# Altium PCB Single_ETU_b_rev1.PcbDoc (part 5 of 6)
Units mil, origin at the board's own origin, x right, y up, seen from the top; angles counter-clockwise.
Board outline 5341 x 2710 mil, 10 copper layers (Top Layer, GND1, Signal 1, GND2, VDDA, VDD, GND3, Signal 2, GND4, Bottom Layer), stack 59.76 mil thick; 283 components, 478 nets, 1863 pads, 875 vias.
Unrouted connection lines stored in the file: 3.
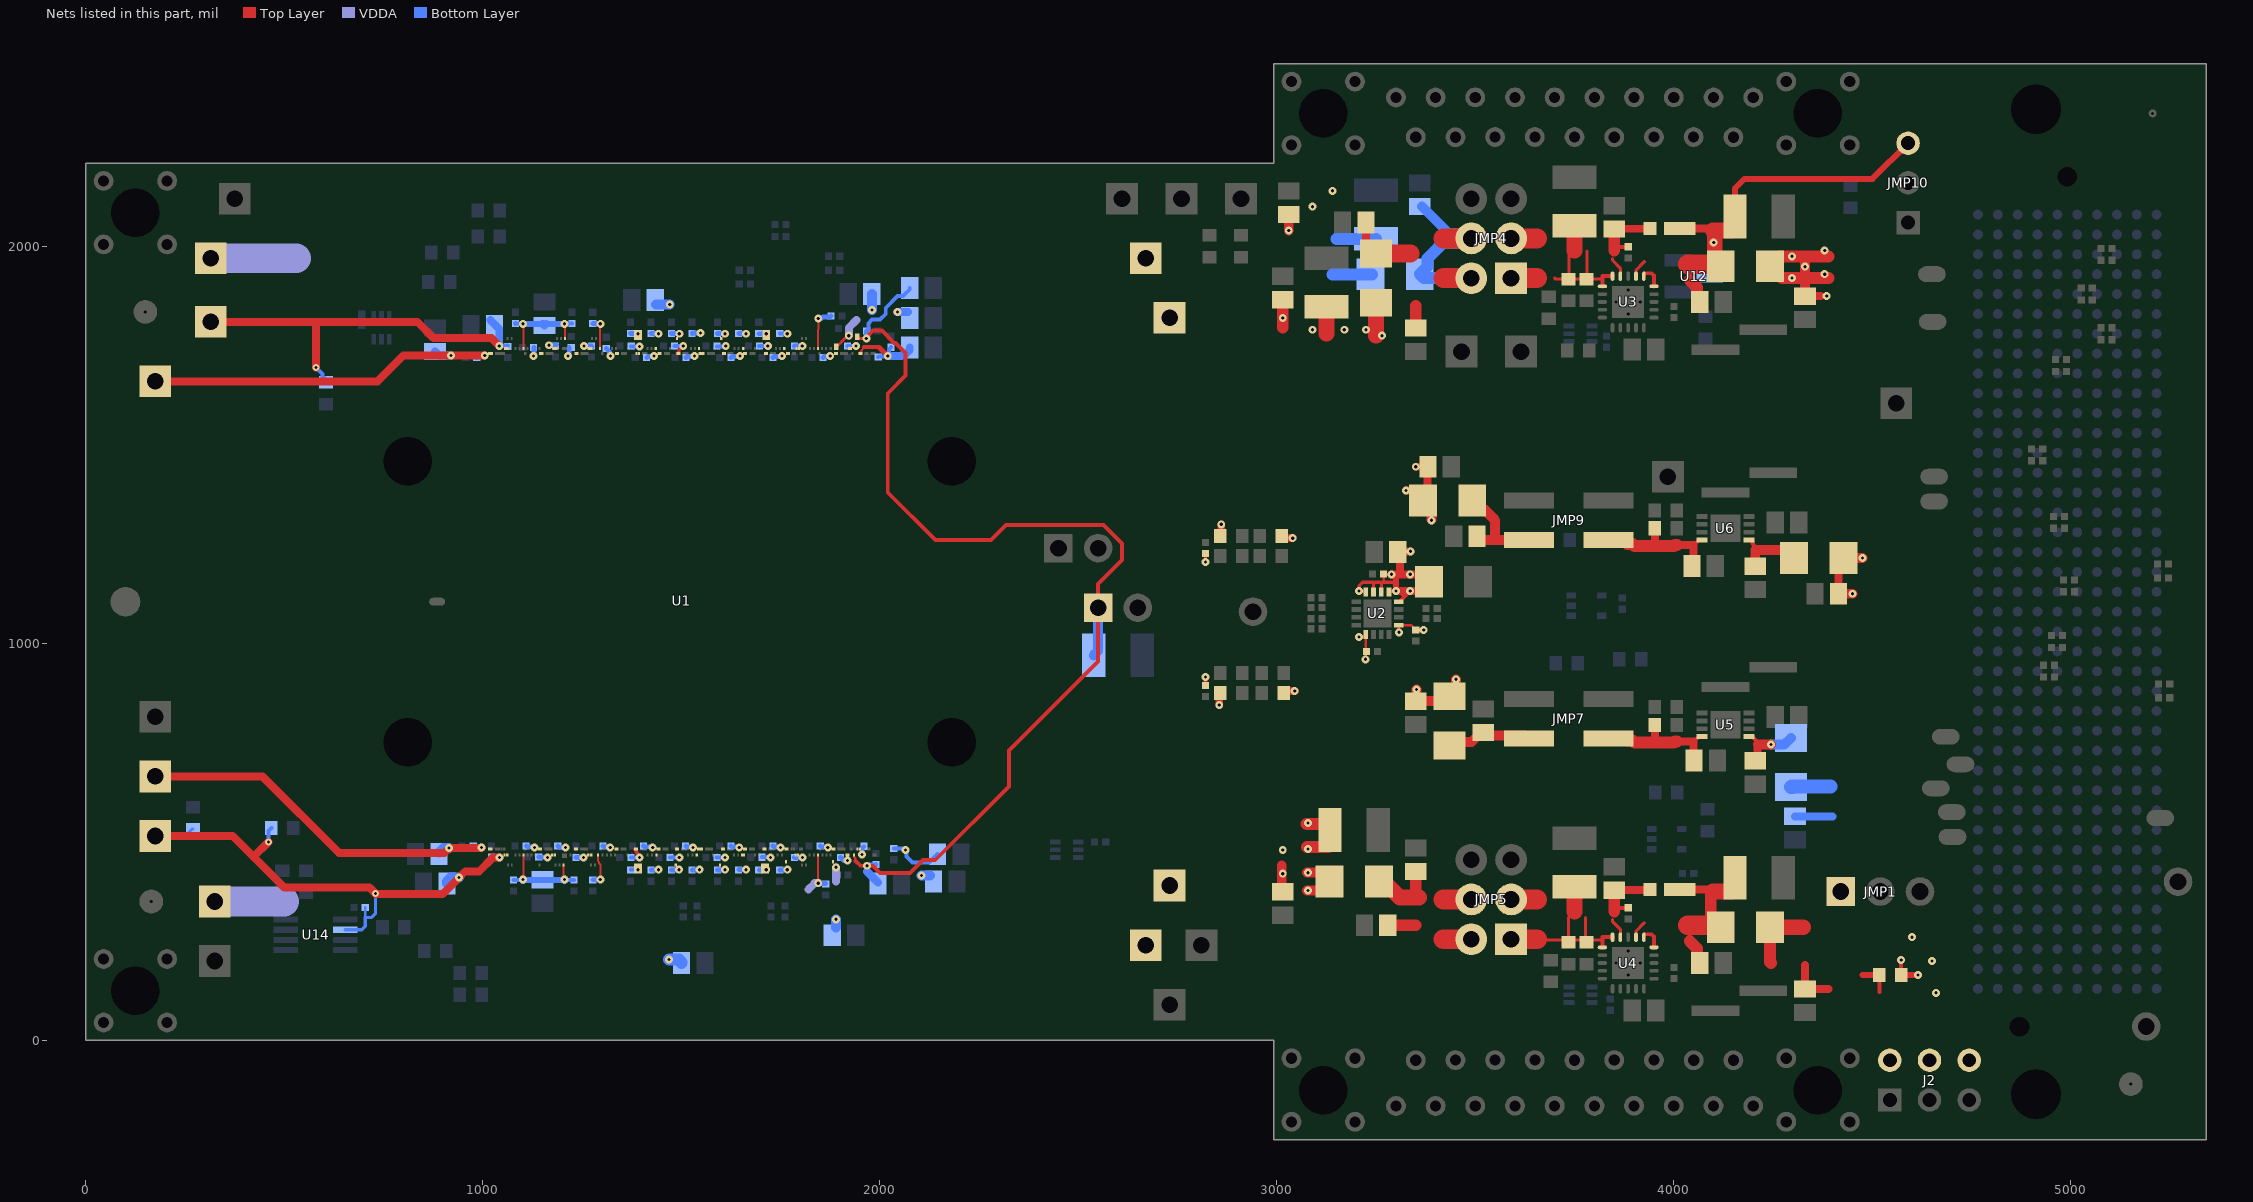
[diagram p13: the nets of this part, all layers, seen from the top]

## Via types
v1: diameter 20, hole 8, Top Layer to Bottom Layer, tented bottom, 402 vias
v2: diameter 20, hole 8, Top Layer to Bottom Layer, 199 vias
v3: diameter 30, hole 16, Top Layer to Bottom Layer, 160 vias
v4: diameter 20, hole 8, Top Layer to Bottom Layer, tented top, 89 vias
v5: diameter 18, hole 8, Top Layer to Bottom Layer, 6 vias
v6: diameter 18/25/25/25/25/18 (per signal layer), hole 8, Top Layer to Bottom Layer, tented bottom, 4 vias
v7: diameter 18/20/20/20/20/18 (per signal layer), hole 8, Top Layer to Bottom Layer, tented bottom, 4 vias
v8: diameter 80, hole 42, Top Layer to Bottom Layer, 2 vias
v9: diameter 18/25/25/25/25/18 (per signal layer), hole 8, Top Layer to Bottom Layer, 2 vias
v10: diameter 20/20/20/20/20/18 (per signal layer), hole 8, Top Layer to Bottom Layer, tented bottom, 2 vias
v11: diameter 40/20/20/20/20/40 (per signal layer), hole 8, Top Layer to Bottom Layer, 2 vias
v12: diameter 20/20/20/20/20/18 (per signal layer), hole 8, Top Layer to Bottom Layer, 1 vias
v13: diameter 40/20/20/20/20/40 (per signal layer), hole 8, Top Layer to Bottom Layer, tented top, 1 vias
v14: diameter 20, hole 8, Top Layer to Bottom Layer, tented both sides, 1 vias

## Nets (pads, with @x,y where several pads share a name; then routed paths per layer and width w, separated by ;. In a path a pad name is that pad's centre, name@x,y a point inside that pad or via, vN(x,y) a via of type N, cw(c..) or ccw(c..) an arc to the next point about the centre after c; other vN are vias at no path point) (continued)
VCC_33_U2: C67.1 C68.1 C69.1 C76.1 C163.1 C164.1 L1.2 R4.2 R5.2 R6.2 R7.2 U2.5 U2.9 U2.12 U2.13 U2.14 U2.15 U2.16 | length 887.8
  Top Layer w6: v4@3224,961 C69.1@3224,979 ; C69.1@3224.02,978.02 3224.02,1018.82 U2.5@3224.02,1021.93 ; C68.1@3265.68,1174 v4(3289,1174) ; 3269,1153.68 C68.1@3269,1177 ; U2.9@3307.09,1045.95 3338.05,1045.95 C76.1@3350,1034 v4(3370,1034) ; v4@3307.54,1028.46 U2.9@3307.54,1045.49
  Top Layer w7: v4@3208.49,1130.51 U2.16@3223.11,1130.51 ; v4@3208.91,1017.91 U2.5@3223.11,1017.91 ; U2.13@3283.58,1130.51 v4@3298.51,1130.51 ; U2.9@3307.09,1045.95 U2.9@3307.54,1045.49 ; v4@3307.54,1028.46 v4(3308,1028)
  Top Layer w8: v4(2820,1205) C163.1@2820,1226 ; v4@3207.75,1131.25 3207.75,1145.75 3216,1154 3248.5,1154 ; U2.15@3243.31,1129.02 3243.31,1148.81 3248.5,1154 ; U2.14@3263.39,1129.02 3263.39,1152.64 3264.75,1154 ; v4@3286.7,1171.7 v4(3289,1174) ; v4@3298.51,1130.35 v4@3298.51,1130.51 ; v4(3300,1132) 3305,1132 3320.22,1116.78 ; 3300,1146 3292,1154 3264.75,1154 ; U2.12@3307.09,1105 U2.12@3309,1105 ; 3248.5,1154 3264.75,1154
  Top Layer w9: U2.12@3309,1105 v4(3336,1132)
  Top Layer w10: C164.1@2820,894 v4(2820,915) ; R7.2@3017.56,875 R7.2@3022.56,880 ; v4(3207,1016) v4@3208.91,1017.91 ; v4(3207,1132) v4@3208.49,1130.51 ; U2.5@3223.11,1017.91 3224.02,1018.82 U2.5@3224.02,1021.93 ; U2.16@3223.11,1130.51 3224.02,1129.6 U2.16@3224.02,1129.02 ; U2.13@3282.68,1129.02 3282.68,1129.6 U2.13@3283.58,1130.51 ; v4@3298.51,1130.51 v4(3300,1132) ; v4@3299,1135 v4@3300,1134 ; v4(3370,1034) v4@3370,1036
  Top Layer w15: v4(3300,1132) 3300,1134 3300,1146 3300,1174 3300,1175
  Top Layer w20: v4(2855,845) R6.2@2855,868.32 ; R5.2@2860,1276.68 v4(2860,1300) ; R4.2@3016.68,1265 v4(3040,1265) ; R7.2@3022.56,880 v4(3045,880) ; v4(3289,1174) 3300,1174 v4(3336,1174) L1.2@3359.32,1174 ; v4(3300,1132) L1.2@3359.32,1132 ; C67.1@3304.53,1230 3304.53,1224.09 3310,1218.62 3310,1175 ; C67.1@3313.68,1232 v4(3337,1232)
  other v4: 3223,960
VDD: C2.1 C5.1 C8.1 C12.1 C16.1 C20.1 C24.1 C27.1 C31.1 C35.1 C38.1 C41.1 C45.1 C49.1 C53.1 C57.1 C60.1 C64.1 C84.1 C85.1 C86.1 C87.1 C121.1 C122.1 C178.1 L3.2 R36.1 R37.1 R39.1 TP8.1 TP13.1 U1.7 U1.8 U1.25 U1.26 U1.39 U1.40 U1.57 U1.58 U1.73 U1.74 U1.91 U1.92 U1.107 U1.108 U1.119 U1.120 U1.139 U1.140 U1.154 U1.155 U1.172 U1.173 U1.186 U1.187 U1.204 U1.205 U1.220 U1.221 U1.238 U1.239 U1.254 U1.255 U1.266 U1.267 U1.286 U1.287 U14.2 | length 3110.5
  Top Layer w8: U1.220@1490,1730 1490,1731.34 1493.95,1735.29 1493.95,1737.68 1505,1748.73 v1(1505,1749)
  Top Layer w9: U1.57@1383,482 1387.05,477.95 1387.05,474.09 1391.9,469.24 v1@1391.9,463.1 ; v1@1392.9,463.1 v1(1395,461)
  Top Layer w20: TP13.1@175,515 370,515 422.5,462.5 ; TP8.1@315,1810 575,1810 ; v5(460,500) 422.5,462.5 ; v5(580,1695) 580,1805 575,1810 ; v5@730,369 899,369 v1(940,410) 956,426 991,426 1026,461 v1(1042,461) ; v5(730,370) 715,385 500,385 422.5,462.5 ; v1(1041.53,1749) 1021.53,1769 876,1769 835,1810 575,1810
  Top Layer w30: 3015,1795 C85.1@3015,1865.47
  Top Layer w40: 3125,1780 C84.1@3125,1847.95 C84.1@3130.02,1852.98 ; L3.2@3244.98,1852.98 L3.2@3250,1858 3250,1775
  Bottom Layer w7: 704,311.24 C178.1@704,335
  Bottom Layer w8: TP13.1@175,515 180,510 245.59,510 268.03,532.44 R39.1@270,532.44 ; U14.2@653.8,278.8 695.31,278.8 704,287.49 704,311.24 705.24,310 720,310 730,320 v5(730,370)
  Bottom Layer w10: v5(460,500) 460,527.56 R37.1@467.44,535 ; v5(580,1695) 595.93,1679.06 595.93,1668.31 601.69,1668.31 610,1660 607.56,1657.56 R36.1@605,1657.56 ; C12.1@1373,461 v1(1395,461) ; C45.1@1373.43,1748 v1@1396,1748 ; C16.1@1472,461 v1(1495,461) ; C49.1@1483,1749 v1(1505,1749) ; C20.1@1589,461 v1@1613,461 ; C53.1@1589.84,1748 v1@1612.35,1748 ; C57.1@1696,1749 v1(1718,1749) ; C24.1@1703,461.46 v1@1724.54,461.46 ; C64.1@1919,1749 v1(1940,1749)
  Bottom Layer w12: C2.1@1023,460 1023.5,460.5 1041.5,460.5 v1(1042,461) ; v1@1041,1749.5 C35.1@1063,1749.5 ; v1@1041.03,1749.5 v1(1041.53,1749) ; C5.1@1141,462 1141.5,461.5 1162.5,461.5 v1(1163,461) ; v1@1165.53,1752 C38.1@1185.53,1752 ; C8.1@1235,461 v1(1253.57,461) ; v1@1253,1749 C41.1@1274,1749 C41.1@1276,1747 ; v1@1724.54,461.46 v1(1725,461) ; C27.1@1785,461 v1(1805.36,461) ; C60.1@1785,1749 v1(1804.89,1749) ; C31.1@1901,461 1909.03,453 v1(1919,453) v1@1917.03,453
  Bottom Layer w20: C86.1@1019.53,1814.09 1041.53,1792.09 v1(1041.53,1749) ; v1(2045,1835) C87.1@2071.47,1835
  Bottom Layer w25: C121.1@909.53,395 909.53,400.85 918.68,410 v1(940,410) ; v1(2105,415) C122.1@2126.32,415
  other v1: 1610,461 1395,1748 1255,1749 1612,1749 1167,1751
  other v2: 3265,1775 3090,1790 3170,1790 3225,1790 3015,1820
VDD2V5: C32.1 C65.1 C77.1 C106.1 C140.1 J3.1 U1.142 U1.289 | length 2832.5
  Top Layer w6: U1.142@1935,467 1935,462.46 1938,459.46 1938,453 1939,452
  Top Layer w8: U1.289@1943,1772 1947,1768 v1(1966,1768)
  Top Layer w10: 1939,452 1951,440 v1(1968,440) 1968.18,439.82 1983.18,439.82 2001,422 2076.14,422 2108.82,454.68 2139.68,454.68 2325,640 2325,730 2455,860 2455.63,860 2550,954.37 J3.1@2550,1090 2550,1150 2610,1210 2610,1252 2564,1298 2318,1298 2280,1260 2140,1260 2020,1380 2020,1630 2065,1675 2065,1731.87 2039.87,1757 2036.28,1757 2005.28,1788 1983.29,1788 1966,1770.71 v1(1966,1768)
  Bottom Layer w8: v1@1968,441.5 v1@1968,442
  Bottom Layer w10: C65.1@1967,1787 1971,1791 1971,1806 1980.5,1815.5 2000.5,1815.5 2015,1830 2015,1845 2045,1875 2058.82,1875 2075.47,1891.65 C106.1@2075.47,1895
  Bottom Layer w12: v1(1966,1768) 1966.5,1768.5 1966.5,1786.5 C65.1@1967,1787 ; 1968,425.38 1968,442 1968.5,442.5 1989.5,442.5 C32.1@1990,443
  Bottom Layer w20: 1968,425.38 C140.1@1995.33,398.05
  Bottom Layer w25: C77.1@2538.98,970 2550,981.02 J3.1@2550,1090
VDD_RAW: C83.1 C93.1 C116.1 JMP4.2 JMP4.4 L3.1 L6.1 | length 800.6
  Top Layer w20: C83.1@3224.53,2060 3224.53,2007 3249.53,1982 L3.1@3250,1982
  Top Layer w30: C93.1@3350,1790 3350,1850.47
  Top Layer w45: L3.1@3250,1982 3337,1982
  Top Layer w50: 3420,1920 JMP4.2@3490,1920 ; 3420,2020 JMP4.4@3490,2020
  Bottom Layer w25: C116.1@3365.9,2100.47 3439.98,2026.4 ; 3429.98,2020 3429.98,2026.4
  Bottom Layer w30: 3429.98,2020 3380,1970.02 3380,1950 L6.1@3360,1930 3370,1920 3440,1920
  Bottom Layer w50: 3429.98,2020 JMP4.4@3490,2020 ; 3440,1920 JMP4.2@3490,1920
VDD_U3: C88.1 C89.1 C90.1 C91.1 D1.1 JMP4.1 JMP4.3 R23.2 U3.1 U3.19 U3.20 | length 740.3
  Top Layer w8: 3700,1920 3702.44,1917.56 R23.2@3735,1917.56 3820,1917.56 ; R23.2@3736,1918 3736,1988 ; C91.1@3781,1918 3781,1988 ; 3845.63,1969.37 3845.63,1964.37 3865.31,1944.69 U3.19@3865.31,1924.96
  Top Layer w10: U3.1@3820.04,1899.37 3820.04,1924.92 3820,1924.96 U3.20@3845.63,1924.96 ; 3850,1990 3859,1999 C88.1@3885,1999
  Top Layer w20: C89.1@3850,2043.47 3850.91,2044.39 3939.39,2044.39 D1.1@3940,2045
  Top Layer w30: 3850,1990 C89.1@3850,2043.47
  Top Layer w40: 3750,1990 C90.1@3750,2051.98
  Top Layer w50: JMP4.1@3590,1920 3655.32,1920 ; JMP4.3@3590,2020 3655.32,2020
VDDA: C1.1 C4.1 C7.1 C10.1 C14.1 C18.1 C22.1 C26.1 C30.1 C33.1 C34.1 C37.1 C40.1 C43.1 C47.1 C51.1 C55.1 C59.1 C63.1 C66.1 C78.1 C79.1 C103.1 C104.1 C119.1 C120.1 C161.1 C162.1 L5.2 TP7.1 TP12.1 U1.1 U1.2 U1.19 U1.20 U1.33 U1.34 U1.49 U1.50 U1.65 U1.66 U1.81 U1.82 U1.83 U1.99 U1.100 U1.115 U1.116 U1.133 U1.134 U1.143 U1.144 U1.148 U1.149 U1.166 U1.167 U1.180 U1.181 U1.196 U1.197 U1.212 U1.213 U1.228 U1.229 U1.230 U1.246 U1.247 U1.262 U1.263 U1.280 U1.281 U1.290 U1.291 | length 2870.3
  Top Layer w5: U1.290@1948.5,1730 1948.5,1731.5 1954.05,1737.05 1954.05,1738.3 1960,1744.25 1960,1746 ; U1.291@1953.5,1730 1953.5,1735.5
  Top Layer w10: 1960,1746 1998,1746
  Top Layer w12: 1998,1746 v1(2020,1724)
  Top Layer w20: TP12.1@175,665 445,665 637.56,472.44 903.28,472.44 915,484.16 v1(915,485) 996,485 v1(997,486) ; TP7.1@175,1660 735,1660 800,1725 v1(920,1725) v1(1005,1725)
  Top Layer w25: C104.1@3012.41,386.38 3012.41,440.35 ; v2@3076.38,377.59 L5.2@3130.35,377.59 ; v2@3076.38,422.59 L5.2@3130.35,422.59
  Top Layer w30: v2@3075,545 C103.1@3128.98,545 ; v2@3076.38,487.59 C103.1@3130.35,487.59
  Bottom Layer w10: v1(1955,468) 1956.91,469.91 1956.91,485.91 C33.1@1960,489 ; C66.1@1996,1721 1997.5,1722.5 2018.5,1722.5 v1(2020,1724) 2019.74,1724.59 2019.74,1726.27 v1@2019.74,1728.13 ; v1@2020.41,1729.86 2024.8,1741.27 2024.8,1742 C161.1@2028,1746 ; C162.1@2036,483 v1@2064,483 ; v1@2064,484 v1@2065,485 ; v1(2065,480) 2066.91,478.09 2066.91,463.09 2081.92,448.08 2123.82,448.08 C120.1@2145.1,469.37
  Bottom Layer w12: C1.1@975,490 979,486 v1(997,486) v1@999,486 ; C34.1@985,1720 987.47,1722.47 1002.9,1722.47 v1@1004.43,1724 ; C4.1@1110,490 1112.47,487.53 v1@1127.47,487.53 ; v1@1128.47,487.53 v1(1130,486) ; v1@1129,1723.47 C37.1@1129,1745.47 ; C7.1@1189,490 C7.1@1191.47,487.53 ; C7.1@1193.47,485.53 v1@1208.47,485.53 ; v1@1207.47,487.53 v1@1209,486 ; v1@1218,1724 C40.1@1218,1745 ; C10.1@1303,490 1305.47,487.53 v1@1320.04,487.53 ; C43.1@1311,1743 1320.09,1733.91 1320.09,1725.91 v1(1322,1724) ; v1@1319.04,487.53 v1@1320.57,486 ; C14.1@1405,490 1407.47,487.53 1426.47,487.53 v12(1428,486) ; C47.1@1413,1720 C47.1@1415.47,1722.47 ; C47.1@1416.47,1722.47 v1@1430.9,1722.47 ; v1@1429.9,1722.47 v1@1431.43,1724 ; C18.1@1511,490 1513.47,487.53 1528.33,487.53 v1(1529.86,486) ; C51.1@1512,1720 C51.1@1514.47,1722.47 ; C51.1@1515.47,1722.47 v1@1533.3,1722.47 ; v1@1532.3,1722.47 1533.3,1723.46 v1@1533.3,1724 ; C22.1@1625,490 1627.47,487.53 1642.26,487.53 v1@1643.79,486 ; C55.1@1625,1720 1627.47,1722.47 1642.7,1722.47 v1@1644.23,1724 ; C26.1@1731,490 1733.47,487.53 1748.31,487.53 v1(1749.84,486) ; C59.1@1731,1720 1733.47,1722.47 1748.74,1722.47 v1@1750.28,1724 ; C30.1@1850,490 1852.47,487.53 v1@1867.57,487.53 ; C63.1@1857,1720 1859.47,1722.47 1874,1722.47 v1@1875.54,1724 ; v1@1864.57,487.53 v1@1866.1,486
  Bottom Layer w20: C78.1@880,1735.47 890.47,1725 v1(920,1725) ; v1(2020,1724) 2054.47,1724 2057.91,1727.44 2063.82,1727.44 2075.47,1739.09 C79.1@2075.47,1745
  Bottom Layer w25: C119.1@889.53,473.35 901.18,485 v1(915,485)
  other v1: 1208,486 1321,486 1646,486 1869,486 1128,1724 1215,1724 1431,1724 1533,1724 1647.5,1724 1754,1724 1875,1724
  other v2: 3078.62,377.41 3015,420 3078.62,422.41 3015,480 3078.62,482.41 3078.62,547.41
VDDA_RAW: C102.1 C110.1 JMP5.2 JMP5.4 L5.1 | length 415.7
  Top Layer w25: L5.1@3257,400 3272.2,384.79 L5.1@3279.53,377.47
  Top Layer w30: C110.1@3279.53,290 3350,290 ; 3350,360 C102.1@3350,425.47
  Top Layer w40: L5.1@3270,400 3310,360 3357.74,360
  Top Layer w50: L5.1@3257,396.36 L5.1@3257,400 ; 3420,255 JMP5.2@3490,255 ; 3420,355 JMP5.4@3490,355
VDDA_U4: C107.1 C108.1 C109.1 C111.1 D2.1 JMP5.1 JMP5.3 R25.2 U4.1 U4.19 U4.20 | length 769
  Top Layer w8: 3670,260 3677.44,252.56 ; 3677.44,253 R25.2@3735,253 ; 3750,325 3735,310 R25.2@3735,253 ; 3777.52,310 C111.1@3777.52,253 ; 3820.04,254 3821,254 ; 3820.52,253 3820.04,253 C111.1@3777.52,253 ; 3845.63,304.37 3845.63,299.37 3865.31,279.69 U4.19@3865.31,259.96 ; R25.2@3735,253 C111.1@3777.52,253
  Top Layer w10: U4.1@3820.04,234.37 3820.04,253 3820.04,259.92 3820,259.96 U4.20@3845.63,259.96 ; 3850,325 3859,334 C107.1@3885,334
  Top Layer w20: C108.1@3850,378.47 3850.76,379.24 3939.24,379.24 D2.1@3940,380
  Top Layer w30: 3850,325 C108.1@3850,378.47
  Top Layer w40: 3750,325 C109.1@3750,386.98
  Top Layer w50: JMP5.1@3590,255 3655.32,255 ; JMP5.3@3590,355 3655.32,355
VDDGWT: C11.1 C13.1 C15.1 C17.1 C19.1 C21.1 C23.1 C25.1 C44.1 C46.1 C48.1 C50.1 C52.1 C54.1 C56.1 C58.1 C98.1 C134.1 C137.1 L10.2 pad.3@1391,433 pad.3@1391,1777 pad.3@1711,433 pad.3@1714,1777 TP20.1 TP22.1 U1.56 U1.64 U1.72 U1.80 U1.90 U1.98 U1.106 U1.114 U1.203 U1.211 U1.219 U1.227 U1.237 U1.245 U1.253 U1.261 | length 610.6
  Top Layer w5: U1.203@1384,1768 U1.203@1384,1769 ; pad.3@1391,1776 pad.3@1391,1777 v1(1391,1780) ; v1@1495,1774.5 v1(1495,1780) ; v1@1610,1776 1610,1777 v1(1610,1780) ; v1@1663,1776 v1@1663,1777 ; v1(1714,430) pad.3@1714,436 ; v1@1765.5,1778.5 v1(1767,1780)
  Top Layer w6: U1.203@1384,1769 pad.3@1391,1776 ; v1@1661.5,1778.5 v1(1663,1780)
  Top Layer w20: v4(3325,1385) 3343,1385 L10.2@3368,1360 3380,1372 C134.1@3380,1450 ; v4(3350,1445) C134.1@3380.47,1445
  Top Layer w25: v4@3390,1311.68 L10.2@3390,1335
  Bottom Layer w6: C11.1@1372,429 C11.1@1373,430
  Bottom Layer w8: v1@1766.5,1780.5 v1(1767,1780)
  Bottom Layer w10: C11.1@1373,430 v1(1391,430) ; C58.1@1748.5,1780.5 v1@1766.5,1780.5
  Bottom Layer w12: C44.1@1372,1781 1372.5,1780.5 1390.5,1780.5 v1(1391,1780) ; C46.1@1424,1781 1424.5,1780.5 1442.5,1780.5 v1(1443,1780) ; C13.1@1424.5,429.5 1442.5,429.5 v1(1443,430) ; C48.1@1475,1781 1475.5,1780.5 1493.5,1780.5 v1@1494,1780 ; C15.1@1475.5,429.5 1493.5,429.5 v1(1494,430) ; C17.1@1527.5,429.5 1545.5,429.5 v1(1546,430) ; C50.1@1527.5,1780.5 C50.1@1528,1780 ; C50.1@1528,1782 v1(1548,1782) ; C19.1@1591.5,429.5 1609.5,429.5 v1(1610,430) ; C52.1@1591.5,1780.5 1609.5,1780.5 v1(1610,1780) ; C21.1@1644.5,430.5 v1@1662.5,430.5 ; C54.1@1644.5,1780.5 1662.5,1780.5 v1(1663,1780) ; C56.1@1696,1780 v1(1714,1780) ; C23.1@1696.5,429.5 v1@1714.5,429.5 ; C25.1@1748.5,429.5 1766.5,429.5 v1(1767,430)
  Bottom Layer w25: C98.1@1436.62,1854 v1(1471,1854)
  Bottom Layer w30: v1(1468.69,203.55) 1493.82,203.55 1500.47,196.9 C137.1@1500.47,195
  other v1: 1663,430
  other v4: 3390,1310
VDDGWT_RAW: C136.1 JMP9.2 L10.1 | length 269.9
  Top Layer w25: L10.1@3490,1370 3550,1310 3550,1260 ; C136.1@3500,1260 JMP9.2@3635,1260
VDDGWT_U6: C133.1 JMP9.1 R28.2 U6.8 | length 257.3
  Top Layer w10: 4050,1247.47 U6.8@4063,1260.47
  Top Layer w20: 3952.44,1247.13 R28.2@3952.44,1290 ; 4007.47,1247.47 4050,1247.47 ; C133.1@4050,1205.94 4050,1242.47
  Top Layer w30: JMP9.1@3883,1250 JMP9.1@3895.57,1250 ; 3900.57,1245 3950.31,1245 4000.05,1245 ; 4002.53,1247.47 4007.47,1247.47
VDDPLL: C29.1 C62.1 C105.1 C126.1 C139.1 L8.2 TP21.1 TP23.1 U1.132 U1.279 | length 376
  Top Layer w6: U1.279@1887.5,1743 1887.5,1744 U1.279@1888,1744 ; v1@1919,1775 v1(1921.83,1775)
  Top Layer w7: U1.279@1888,1744 v1@1919,1775
  Top Layer w20: L8.2@3422.53,854.53 L8.2@3435,867
  Top Layer w25: v4(3351.57,884.06) 3351.57,856.1 C126.1@3350,854.53 L8.2@3422.53,854.53 ; L8.2@3451.57,881.57 v4(3451.57,909.53)
  VDDA w20: 1890,400 v10(1890,436) ; v1@1922,1775 1922,1795 1941.53,1814.53
  Bottom Layer w12: v10(1890,436) 1891,435 C29.1@1891,418 ; v1@1921.83,1773.89 1922.38,1774.44 v1@1922.91,1774.98 ; v1@1922.91,1775.98 C62.1@1922.91,1790.91
  Bottom Layer w20: C105.1@1979.53,1880 C105.1@1980,1879.53
  Bottom Layer w25: C139.1@1889.53,284.15 v1(1890,305) ; v1(1980,1840) C105.1@1980,1879.53
VDDPLL_RAW: C128.1 JMP7.2 L8.1 | length 219.9
  Top Layer w25: L8.1@3435,743 3443.38,751.38 3490,751.38 3514.09,775.47 C128.1@3520,775.47 3527.97,767.5 3627.5,767.5 JMP7.2@3635,760
VDDPLL_U5: C125.1 JMP7.1 R27.2 U5.8 | length 330.3
  Top Layer w10: 4050,752.47 4063,765.47 U5.8@4071,765.47
  Top Layer w20: JMP7.1@3835,760 JMP7.1@3878,760 ; 3950.31,750 3952.44,752.13 R27.2@3952.44,795 ; 4007.47,752.47 4050,752.47 ; 4050,747.47 4050,710.94 C125.1@4050.94,710
  Top Layer w30: JMP7.1@3878,760 3883,755 3895.57,755 3900.57,750 3950.31,750 4000.05,750 4002.53,752.47 4007.47,752.47
VDDPST: C3.1 C6.1 C9.1 C28.1 C36.1 C39.1 C42.1 C61.1 C97.1 C117.1 C118.1 C130.1 L6.2 TP10.1 TP15.1 U1.13 U1.29 U1.43 U1.127 U1.160 U1.176 U1.190 U1.274 | length 1515.6
  Top Layer w5: 1101,415 1103,417 U1.13@1103,467 ; v1(1101,1805) 1103,1803 U1.160@1103,1743 ; U1.29@1203,442 1203,408 v1(1206,405) ; v1(1206,1805) 1207.02,1803.98 1207.02,1782.84 ; U1.176@1207,1768 1207,1782.82 ; U1.43@1290,467 1290,452.04 1292.95,449.09 1292.95,446.05 1296,443 v1(1296,405) ; U1.190@1295,1743 1295,1804 v1(1296,1805) ; U1.274@1844,1743 1844,1770.97 ; 1844.02,1770.98 1844.02,1790.02 1846,1792 v1@1846,1818 ; U1.127@1844.5,467 1844.5,396.44 v1(1844.94,396) ; v1@1850,1818 v1@1851,1817
  Top Layer w25: v2(3030,2040) C118.1@3030,2080.47
  VDDA w20: 1820,380 1836,396 v1(1844.94,396)
  VDDA w75: TP10.1@315,1970 530,1970 ; TP15.1@325,350 500,350
  Bottom Layer w10: C3.1@1077,404.5 v1@1100.5,404.5 ; C36.1@1082.5,1805.5 v1@1100.5,1805.5 ; v1@1205.5,404.5 C6.1@1230,404.5 ; v1(1206,1805) 1206.5,1805.5 1224.5,1805.5 C39.1@1225,1806
  Bottom Layer w12: C36.1@1082,1806 C36.1@1082.5,1805.5 ; v1@1100.5,1805.5 v1(1101,1805) ; C42.1@1277,1806 1277.5,1805.5 1295.5,1805.5 v1(1296,1805) ; C9.1@1277.5,404.5 v1@1295.5,404.5 ; v1(1844.94,396) 1845.94,395 C28.1@1863,395 ; v1@1850,1818 1852.16,1818 1856.61,1822.44 1874.44,1822.44 C61.1@1877,1825
  Bottom Layer w15: v1(1101,1805) C97.1@1150.47,1805 ; v1@1101.47,404.53 C130.1@1150,404.53 v1@1205.53,404.53 ; C97.1@1159.53,1805 v1(1206,1805)
  Bottom Layer w20: v1(1101,405) v1@1101.47,404.53 ; C97.1@1150.47,1805 C97.1@1155,1800.47 C97.1@1159.53,1805 ; v1@1205.53,404.53 v1(1206,405)
  Bottom Layer w30: 3139.91,1928.98 L6.2@3240,1928.98 ; 3149.91,2018.98 C117.1@3250,2018.98
  other v1: 1845,1818
  other v2: 3090,2100 3140,2140
Vin_1p4_analog: C99.1 J2.2 L4.1 R29.2 | length 379.9
  Top Layer w10: 4517.44,122.44 R29.2@4517.44,165
  Top Layer w15: 4475,165 R29.2@4517.44,165
  Top Layer w20: 4330,190 C99.1@4330,129.53 4389.53,129.53 4390,130
  Top Layer w30: L4.1@4242,285 4242,198 4245,195
  Top Layer w40: L4.1@4242,285 4325,285
Vin_1p4_dig: C80.1 C123.1 C131.1 J2.4 L2.1 L7.1 L9.1 R29.1 | length 908.8
  Top Layer w10: R29.1@4572.56,165 v2(4572.56,202.44)
  Top Layer w15: R29.1@4572.56,165 v2(4615,165)
  Top Layer w20: C80.1@4330,1874.53 4330.47,1875 4370,1875 ; C131.1@4414.53,1130 L9.1@4414.53,1202.53 ; L9.1@4414.53,1197.53 L9.1@4427,1210
  Top Layer w25: C80.1@4330,1874.53 4330,1920 v2(4330,1948.88) 4330,1960 ; C131.1@4414.53,1125 v4(4450,1125) ; L9.1@4427,1215 v4(4475,1215)
  Top Layer w30: 4390,1920 4330,1920 v2(4298,1920) 4272,1920 4267,1925 4262,1925 4242,1945 L2.1@4242,1950 4242,1955 4262,1975 v2(4298,1975) 4390,1975 ; J2.4@4640,-46 J2.4@4644,-50
  Bottom Layer w20: C123.1@4305,564.53 4399.53,564.53
  Bottom Layer w35: L7.1@4295,638 4300,638 4298,640 4395,640
  other v2: 4660,120 4650,200 4600,260 4385,1875 4380,1930 4380,1990
Vin_1p4_U3: C81.1 C82.1 D1.2 JMP10.3 L2.2 U3.15 U3.16 U3.17 U12.D | length 1111.1
  Top Layer w8: U3.17@3904.68,1924.96 3904.68,1940.22 3925.57,1961.11 ; U3.16@3924.37,1924.96 3924.37,1931.66 3925.04,1932.32 3943.86,1932.32
  Top Layer w10: 3943.86,1932.32 3949.96,1926.22 U3.15@3949.96,1899.37
  Top Layer w15: C82.1@4058.82,1866.65 C82.1@4066.27,1859.2 ; C81.1@4153.98,2075 4153.98,2146.02 4177.95,2170 4500,2170 JMP10.3@4590,2260
  Top Layer w20: D1.2@4040,2045 4118,2045
  Top Layer w30: 4040,1915 4058.82,1896.18 C82.1@4058.82,1866.65
  Top Layer w40: 4098.88,2039.88 C81.1@4144.45,2039.88 ; L2.2@4103,1950 4103,2034
  Top Layer w50: 4035,1955 4113,1955 L2.2@4118,1950
  Bottom Layer w20: U12.D@4090.5,1925 4094.33,1925 4100.33,1931 v4(4100.33,2009.46)
Vin_1p4_U4: C100.1 C101.1 D2.2 L4.2 U4.15 U4.16 U4.17 | length 466.1
  Top Layer w8: U4.17@3904.68,259.96 3904.68,275.22 3925.57,296.11 ; U4.16@3924.37,259.96 3924.37,266.66 3925.04,267.32 3943.86,267.32
  Top Layer w10: 3943.86,267.32 3949.96,261.22 U4.15@3949.96,234.37
  Top Layer w15: C101.1@4058.82,201.65 C101.1@4066.27,194.2
  Top Layer w20: D2.2@4040,380 4118,380
  Top Layer w30: 4040,250 4058.82,231.18 C101.1@4058.82,201.65 ; L4.2@4093,285 4093,369
  Top Layer w40: 4098.88,374.88 C100.1@4144.45,374.88
  Top Layer w50: 4035,290 4113,290 L4.2@4118,285
Vin_1p4_U5: C124.1 L7.2 U5.1 | length 175.2
  Top Layer w10: U5.1@4189,765.47 4197,765.47 4212,750.47 4212,745
  Top Layer w20: C124.1@4211,696.53 4211,747
  Top Layer w25: 4212,745 v2(4245,745)
  Bottom Layer w25: v2(4245,745) 4278,745 L7.2@4295,762
Vin_1p4_U6: C132.1 L9.2 U6.1 | length 152.3
  Top Layer w10: U6.1@4189,1260.47 4197,1260.47 4198,1259.47 4198,1251.47 4205,1244.47 4205,1235
  Top Layer w25: C132.1@4205,1184.53 4205,1235 ; 4210,1235 L9.2@4275,1235
Vin_3p3_raw: J2.6 JMP1.1
pads on no net: J1.A26 J1.A27 J1.A30 J1.A31 J1.A34 J1.A35 J1.A38 J1.A39 J1.B1 J1.B28 J1.B29 J1.B32 J1.B33 J1.B36 J1.B37 J1.B40 J1.C2 J1.C3 J1.C6 J1.C7 J1.C26 J1.C27 J1.D1 J1.D4 J1.D5 J1.D29 J1.D33 J1.D34 J1.E2 J1.E3 J1.E6 J1.E7 J1.E9 J1.E10 J1.E12 J1.E13 J1.E15 J1.E16 J1.E18 J1.E19 J1.E21 J1.E22 J1.E24 J1.E25 J1.E27 J1.E28 J1.E30 J1.E31 J1.E33 J1.E34 J1.E36 J1.E37 J1.F1 J1.F4 J1.F5 J1.F7 J1.F8 J1.F10 J1.F11 J1.F13 J1.F14 J1.F16 J1.F17 J1.F19 J1.F20 J1.F22 J1.F23 J1.F25 J1.F26 J1.F28 J1.F29 J1.F31 J1.F32 J1.F34 J1.F35 J1.F37 J1.F38 J1.G2 J1.G3 J1.G12 J1.G13 J1.H1 J1.H7 J1.H8 J1.H10 J1.H11 J1.H19 J1.H20 J1.H34 J1.H35 J1.H37 J1.H38 J1.J2 J1.J3 J1.J6 J1.J7 J1.J9 J1.J10 J1.J12 J1.J13 J1.J15 J1.J16 J1.J18 J1.J19 J1.J21 J1.J22 J1.J24 J1.J25 J1.J27 J1.J28 J1.J30 J1.J31 J1.J33 J1.J34 J1.J36 J1.J37 J1.J39 J1.K1 J1.K4 J1.K5 J1.K7 J1.K8 J1.K10 J1.K11 J1.K13 J1.K14 J1.K16 J1.K17 J1.K19 J1.K20 J1.K22 J1.K23 J1.K25 J1.K26 J1.K28 J1.K29 J1.K31 J1.K32 J1.K34 J1.K35 J1.K37 J1.K38 J1.K40 J1.MH1 J1.MH2 U2.6 U3.2 U3.5 U3.6 U3.7 U3.9 U3.10 U3.11 U4.2 U4.5 U4.6 U4.7 U4.9 U4.10 U4.11 U5.3 U6.3

## Polygon pours and split planes (outlines as drawn)
no net on Top Solder "NONET_L-01_P-001" (solid): 1005,1790 1005,417 1985,417 1985,1790
VDDPST on VDDA "VDDPST_C" (solid, pour order 109): 1845,201.43 358.57,201.43 70,490 70,1700.79 365,1995.79 504.52,2150 3410,2150 3410,1730 2990,1730 2769.45,1939.95 1924.42,1944.42 1860.09,1880.09 1860.09,1809.88 1830.01,1779.8 780.01,1779.8 640.01,1624.8 640.01,479.8 690.01,429.8 1825.2,429.8 1845,410
VDDA on VDDA "VDDA_L05_P105" (solid, pour order 105): 3130.01,689.8 3130.01,339.81 2960.01,339.81 2835.2,454.81 1875.01,454.8 709.69,454.83 670.01,494.51 670.01,1609.8 810.01,1749.8 2230.01,1749.8 2590.01,1389.8 2590.01,1229.8
VDDPLL on VDDA "VDDPLL_L05_P107" (solid, pour order 107): 1870.01,419.8 1930.01,419.8 1942.23,429.8 2814.18,429.8 2944.18,309.8 3160.01,309.8 3160.01,729.8 3290.01,859.8 3290.01,869.8 3360.01,939.8 3470.01,939.8 3500.01,909.8 3500.01,549.8 3440.01,489.8 3440.01,279.8 3390.01,229.8 2886.17,229.8 1888.11,229.8 1870.01,247.9
VDDPLL on VDDA "VDDPLL_L05_P108" (solid, pour order 108): 3470.01,1179.81 3470.01,729.8 3160.01,729.8 2630.01,1259.8 2630.01,1399.8 2240.01,1789.8 1890.01,1789.8 1890.01,1854.8 1935.01,1899.8 2750.01,1899.8
3P3V on VDDA "NONET_L-01_P-001" (solid, pour order 161): 3780.5,200 1910,200 1880,170 1060,170 1060,60 3010,60 3038.72,31.28 3779.34,29.34
3P3V on VDDA "3P3V_L05_P110" (solid, pour order 110): 4600.01,249.8 4325.01,249.8 4115.21,40 3650.01,40 3650.01,699.8 3650.01,824.8 3510,964.82 3510,2160 4340,2160 4567.66,1932.34
GND on VDDA "GND_L05_P116" (solid, pour order 116): 2992.01,-250.2 2992.01,-0.2 4488.01,-0.2 4488.01,-250.2
GND on VDDA "GND_L05_P115" (solid, pour order 115): 2992.01,2209.8 2992.01,2459.8 4488.01,2459.8 4488.01,2209.8
GND on VDDA "GND_L05_P114" (solid, pour order 114): 0.01,-0.2 250.01,-0.2 250.01,249.8 0.01,249.8
GND on VDDA "GND_L05_P113" (solid, pour order 113): 0.01,1959.8 250.01,1959.8 250.01,2209.8 0.01,2209.8
GND on VDDA "GND_L05_P112" (solid, pour order 112): 0.01,2209.8 250.01,2209.8 250.01,1959.8 0.01,1959.8
VADJ on VDDA "VADJ_L05_P106" (solid, pour order 106): 4795.01,72.8 4795.01,239.8 4955.01,239.8 4955.01,294.8 5295.01,294.8 5295.01,239.8 5295.01,-70.2 5029.01,-70.2 4886.01,72.8
no net on Top Layer "NONET_L01_P158" (solid, pour order 158): 3265,2010 3265,1995 3315,1995 3315,1920 3310,1920 3310,1835 3435,1835 3435,2050 3300,2050 3300,2010
Vin_1p4_dig on Top Layer "NONET_L-01_P-001" (solid, pour order 157): 4605,125 4640,90 4670,90 4690,110 4690,250 4660,280 4540,280 4540,210 4555,195 4595,195 4605,185
Vin_1p4_dig on Top Layer "NONET_L-01_P-001" (solid, pour order 156): 4310,2000 4310,1923.76 4351.24,1923.76 4370,1905 4370,1860 4375,1855 4410,1855 4470,1915 4470,2005 4440,2035 4345,2035
VDDA_U4 on Top Layer "VDDA_U4_L01_P155" (solid, pour order 155): 3645,380 3680,380 3680,345 3865,345 3865,285 3829.96,285 3830.04,252.94 3807,253.08 3807,275 3705,275 3705,240 3645,240
GND on Top Layer "GND_L01_P153" (solid, pour order 153): 2992,-250 2992,0 4480,0 4480,-250
GND on Top Layer "GND_L01_P139" (solid, pour order 139): 2992,2210 2992,2460 4488,2460 4488,2210
GND on Top Layer "GND_L01_P137" (solid, pour order 137): 250,250 250,0 0,0 0,250
GND on Top Layer "GND_L01_P136" (solid, pour order 136): 250,2210 250,1960 0,1960 0,2210
VDD on Top Layer "VDD_L01_P135" (solid, pour order 135): 3290,1805 3290,1750 2990,1750 2990,1830 3055,1830 3055,1805 3245,1805
VDD_RAW on Top Layer "VDD_RAW_L01_P134" (solid, pour order 134): 3265,2010 3265,1995 3315,1995 3315,1920 3310,1920 3310,1835 3435,1835 3435,2050 3300,2050 3300,2010
VDDA on Top Layer "VDDA_L01_P133" (solid, pour order 133): 2985,410 3055,410 3055,365 3090,365 3090,560 2985,560
VDDA_RAW on Top Layer "VDDA_RAW_L01_P132" (solid, pour order 132): 3295,350 3295,330 3315,330 3315,255 3310,255 3310,170 3435,170 3435,385 3300,385 3300,350
Vin_1p4_U4 on Top Layer "VIN_1P4_U4_L01_P131" (solid, pour order 131): 3910,350 4065,350 4065,240 3975,240 3975,255 3940,255 3940,285 3910,285
Vin_1p4_U3 on Top Layer "VIN_1P4_U3_L01_P129" (solid, pour order 129): 3910,2015 4065,2015 4065,1905 3975,1905 3975,1920 3940,1920 3940,1950 3910,1950
VDD_U3 on Top Layer "VDD_U3_L01_P128" (solid, pour order 128): 3645,2045 3680,2045 3680,2010 3865,2010 3865,1950 3829.96,1950 3830.04,1919.31 3810,1919.42 3810,1945 3705,1945 3705,1905 3645,1905
FMC_3P3V on Top Layer "FMC_3P3V_L01_P127" (solid, pour order 127): 4555,320 4555,435 5060,435 5175,320 5175,70 4960,70 4960,265 4905,320
Vin_1p4_analog on Top Layer "VIN_1P4_ANALOG_1" (solid, pour order 126): 4625,-100 4495,-100 4495,15 4370,15 4370,165 4289.97,165 4280.03,155 4205,155 4205,230 4294.95,230 4294.95,330.05 4344.95,330.05 4400,275 4421.73,275 4490,201.65 4490,135 4544.53,135 4625,55.77
FMC_3P3V on Top Layer "FMC_3P3V_L01_P041" (solid, pour order 41): 4555,320 4555,435 5060,435 5175,320 5175,70 4960,70 4960,265 4905,320
3P3V on VDD "NONET_L-01_P-001" (solid, pour order 162): 850,1820 610,1580 610,550 850,310 1130,310 1260,180 1260,90 1230,60 570,60 350,280 350,350 310,390 130,390 70,450 70,1820 150,1900 330,1900 430,2000 750,2000 850,1900
VDD on VDD "VDD_L06_P118" (solid, pour order 118): 3230,1870 3300,1800 3300,1530 3167.96,1397.96 2767.96,1397.96 2660,1290 2660,720 2291.96,351.96 1890,350 1790,450 1365,450 1250,350 881,351.96 650,582.96 650,1540 910,1800 1320,1800 1360,1760 1790,1760 1900,1870 3140,1870
VDDGWT on VDD "VDDGWT_L06_P121" (solid, pour order 121): 3410,1215 3410,1255 3310,1355 3290,1355 3270,1375 3270,1415 3350,1515 3350,1805 3260,1895 1905,1895 1780,1770 1380,1770 1350,1800 1350,2055 1445,2150 2985.02,2149.98 3035,2100 3490,2100 3670,1925 3670,1315 3530,1175 3450,1175
VDDGWT on VDD "VDDGWT_L06_P122" (solid, pour order 122): 1780,440 1380,440 1300,360 1300,220 1460,60 2603.5,60 2973.6,471.22 3349.88,468.88 3720.5,839.5 3723.31,1337.02 3620,1440 3484.13,1439.15 3400,1360 3400,960 3220,780 2780,780 2330,330 1890,330
GND on VDD "GND_L06_P123" (solid, pour order 123): 3015,-229.98 3015,35 2940,110 2940,340 3020,420 3370,420 3770,820 3770,1350 3700,1420 3700,1941.89 3471.89,2170 3040,2170 3015,2195 3015,2440 4500,2438.99 4500,660 4270,430 4270,130.35 4400.44,129.71 4490,45 4490,-229.98
GND on VDD "GND_L06_P125" (solid, pour order 125): 0,0 250,0 250,250 0,250
GND on VDD "GND_L06_P124" (solid, pour order 124): 0,1960 250,1960 250,2210 0,2210
Vin_3p3_raw on VDD "VIN_3P3_RAW_L06_P120" (solid, pour order 120): 4664.88,-100 4777.88,-100 4810,-67.88 4810,330 4700,440 4485,440 4350,440 4330,420 4330,190 4406.2,190 4664.88,-43.86
12P0V on VDD "12P0V_L06_P119" (solid, pour order 119): 4950,205 4950,500 5295,500 5295,205
VCC_33_U2 on VDD "VCC_33_U2_L06_P117" (solid, pour order 117): 2765,815 2710,870 2710,1243.33 2775.3,1319.52 3285,1325 3370,1240 3370,985 3200,815
VDDPST on Bottom Layer "NONET_L-01_P-001" (solid, pour order 160): 3140,1890 2980,2050 2980,2170 3175,2170 3175,1890
Vin_1p4_dig on Bottom Layer "VIN_1P4_DIG_L10_P141" (solid, pour order 141): 4710,-100 4730,-100 4730,100 4710,125 4710,460 4630,540 4630,937.3 4630,970 4567.93,1028.69 4529.23,1029.75 4510,1051.11 4510,1180 4594,1264 4594,1881 4408.52,2066.48 4200,2066.48 4200,1360.35 4249.25,1304.31 4249.96,927.04 4350,825.01 4350,200 4560,-10 4560,-100
GND on Bottom Layer "GND_L10_P146" (solid, pour order 146): 2992,2210 2992,2460 4488,2460 4488,2210
GND on Bottom Layer "GND_L10_P145" (solid, pour order 145): 671,1695 2321,1695 2321,515 671,515
GND on Bottom Layer "GND_L10_P144" (solid, pour order 144): 2992,-250 2992,0 4488,0 4488,-250
GND on Bottom Layer "GND_L10_P143" (solid, pour order 143): 250,250 250,0 0,0 0,250
GND on Bottom Layer "GND_L10_P142" (solid, pour order 142): 251.7,2209.5 251.7,1959.5 1.7,1959.5 1.7,2209.5
GND on Signal 1 "GND_L03_P148" (solid, pour order 148): 3012.39,2439.61 3012.39,2122.96 2980,2090.57 2980,1880 3015,1845 3770,1845 3810,1790 3810,1720 4261.06,1720 4490,1961.7 4490,2439.99
GND on Signal 1 "GND_L03_P147" (solid, pour order 147): 3010,-230 3012.41,-227.59 3012.41,413.36 3013.37,413.36 3160,560 3820,560 3920,460 4210,460 4490,180 4490,-230
GND on Signal 1 "GND_L03_P150" (solid, pour order 150): 0,0 250,0 250,250 0,250
GND on Signal 1 "GND_L03_P149" (solid, pour order 149): 0,2210 250,2210 250,1960 0,1960
3P3V on Signal 2 "NONET_L-01_P-001" (solid, pour order 163): 2719.91,1940.09 2719.91,2150 4240,2150 4270,2120 4270,1871.6 4214.19,1815.79 4113.95,1815.79 3996.76,1718.13 2935.8,1724.2
GND on Signal 2 "GND_L08_P154" (solid, pour order 154): 2992,2210 2992,2460 4488,2460 4488,2210
GND on Signal 2 "GND_L08_P138" (solid, pour order 138): 2992,-250 2992,0 4480,0 4480,-250
GND on Signal 2 "GND_L08_P152" (solid, pour order 152): 0,1960 250,1960 250,2210 0,2210
GND on Signal 2 "GND_L08_P151" (solid, pour order 151): 0,0 250,0 250,250 0,250
GND on GND1 (split plane): 5320.9,-229.9 3012.1,-229.9 3012.1,0 3011.71,3.92 3010.57,7.69 3008.71,11.17 3006.21,14.21 3003.17,16.71 2999.69,18.57 2995.92,19.71 2992,20.1 20.1,20.1 20.1,2189.9 2992,2189.9 2995.92,2190.29 2999.69,2191.43 3003.17,2193.29 3006.21,2195.79 3008.71,2198.83 3010.57,2202.31 3011.71,2206.08 3012.1,2210 3012.1,2439.9 5320.9,2439.9
GND on GND2 (split plane): 5320.9,-229.9 3012.1,-229.9 3012.1,0 3011.71,3.92 3010.57,7.69 3008.71,11.17 3006.21,14.21 3003.17,16.71 2999.69,18.57 2995.92,19.71 2992,20.1 20.1,20.1 20.1,2189.9 2992,2189.9 2995.92,2190.29 2999.69,2191.43 3003.17,2193.29 3006.21,2195.79 3008.71,2198.83 3010.57,2202.31 3011.71,2206.08 3012.1,2210 3012.1,2439.9 5320.9,2439.9
GND on GND3 (split plane): 5320.9,-229.9 3012.1,-229.9 3012.1,0 3011.71,3.92 3010.57,7.69 3008.71,11.17 3006.21,14.21 3003.17,16.71 2999.69,18.57 2995.92,19.71 2992,20.1 20.1,20.1 20.1,2189.9 2992,2189.9 2995.92,2190.29 2999.69,2191.43 3003.17,2193.29 3006.21,2195.79 3008.71,2198.83 3010.57,2202.31 3011.71,2206.08 3012.1,2210 3012.1,2439.9 5320.9,2439.9
GND on GND4 (split plane): 5320.9,-229.9 3012.1,-229.9 3012.1,0 3011.71,3.92 3010.57,7.69 3008.71,11.17 3006.21,14.21 3003.17,16.71 2999.69,18.57 2995.92,19.71 2992,20.1 20.1,20.1 20.1,2189.9 2992,2189.9 2995.92,2190.29 2999.69,2191.43 3003.17,2193.29 3006.21,2195.79 3008.71,2198.83 3010.57,2202.31 3011.71,2206.08 3012.1,2210 3012.1,2439.9 5320.9,2439.9

## Keep-outs
Top Layer:
  circle w75: c811,1459 r75
  circle w75: c811,751 r75
  circle w75: c2180,750 r75
  circle w75: c2181,1459 r75
  rectangle: 265,202 996,1074
  rectangle: 0.5,870 270,1060
  rectangle: 265,1992 2756,2210
  rectangle: 265,0 2763,182
  rectangle: 1997,180 2757,2003
  rectangle: 265,1135 996,2008
  rectangle: 0.5,1150 270,1350
Keep-Out Layer:
  circle w72: c4363,2335 r36
  circle w72: c3117,2335 r36
  circle w72: c3117,-125 r36
  circle w72: c4363,-125 r36
  circle w120: c4912.26,2345.15 r60
  circle w120: c4912.26,-135.15 r60

## Other copper
Top Layer:
  rectangle net VDDA: 1945,1718 1956.01,1734
  rectangle net VDDGWT: 1598,1764 1620,1790
  region net VDDGWT: 1770,425 1770,440 1757,440 1757,425
  rectangle net VDDGWT: 1433,1739 1445,1784
  rectangle net VDDGWT: 1483,420 1504,446
  rectangle net VDD: 1705,465 1714,481
  region net VDDPLL: 1892,426 1892,454 1879,454 1879,426
  region net VDDGWT: 1774,424 1774,459 1761,459 1761,424
  rectangle net VDDGWT: 1434,420 1446,471
  rectangle net VDDGWT: 1536,420 1549,471
  rectangle net VDDGWT: 1651,420 1665,471
  rectangle net VDDGWT: 1595,420 1620,446
  rectangle net GND: 1961.49,1705 1971.49,1734
  rectangle net VDDGWT: 1484.32,1764 1505,1790
  rectangle net VDDGWT: 1756.5,1739 1769,1782
  rectangle net VDDGWT: 1653,1739 1665,1782
  rectangle net VDDGWT: 1542.5,1739 1554.5,1789
  rectangle net GND: 1900.01,1705 1934,1734
  rectangle net GND: 1778.5,1705 1851,1734
  rectangle net GND: 1723.5,1705 1738.5,1734
  rectangle net GND: 1671.5,1705 1686.5,1734
  rectangle net VDD: 1491,1739 1507,1758
  rectangle net GND: 1617,1705 1632,1734
  rectangle net GND: 1564.5,1705 1584.5,1734
  rectangle net GND: 1503,1705 1518,1734
  rectangle net GND: 1456,1705 1471,1734
  rectangle net GND: 1400.5,1705 1415.5,1734
  rectangle net GND: 1348.5,1705 1364,1734
  rectangle net GND: 1246.5,1705 1305,1734
  rectangle net GND: 1158.5,1705 1198,1734
  rectangle net GND: 1031,1705 1111,1734
  rectangle net VDD: 1704.5,476 1714.5,492
  region net GND: 1977,505 1967,505 1967,478 1977,478
  rectangle net VDDA: 1945,466 1960,493
  rectangle net VDDA: 1941.5,476 1960,493
  region net GND: 1895.34,462 1895.34,471 1874,471 1874,462
  rectangle net GND: 1894,462 1906,479
  rectangle net GND: 1893.5,476 1931,505
  rectangle net VDD: 1911.5,451 1926,471
  rectangle net VDDA: 1867,476 1888.5,493
  rectangle net GND: 1775.5,476 1852,505
  rectangle net GND: 1719.5,476 1734.5,505
  rectangle net VDD: 1714,454 1731,471
  rectangle net GND: 1670.5,476 1685.5,505
  rectangle net GND: 1615.5,476 1630.5,505
  rectangle net GND: 1620,478 1630,494
  rectangle net VDDA: 1640.5,476 1665.5,492
  rectangle net GND: 1559.5,476 1579.5,505
  rectangle net GND: 1499.5,477 1514.5,505
  rectangle net GND: 1346.5,476 1363,505
  rectangle net GND: 1397.45,478 1412.45,505
  rectangle net VDD: 1483.5,478 1494.5,492
  rectangle net VDD: 1484.5,473 1494.5,479
  rectangle net GND: 1452.5,476 1467.5,505
  rectangle net VDDA: 1204,476 1240,492
  rectangle net GND: 1245.5,476 1303,505
  rectangle net VDDA: 1124.5,476 1149.5,492
  rectangle net GND: 1155.25,476 1189,505
  rectangle net GND: 1031,476 1110,505
  rectangle net VDDA: 994,476 1025,492
  rectangle net VDDA: 1317.5,1718 1343.5,1734
  rectangle net VDDA: 1870.49,1718 1894.49,1734
  rectangle net VDD: 1919,1739 1942,1758
  rectangle net VDD: 1385,1718 1395.5,1752
  rectangle net VDDA: 1212,1718.06 1241.01,1733.94
  rectangle net VDDA: 1124,1718.06 1152.99,1733.94
  rectangle net VDDA: 1001.5,1718 1025.5,1735
  rectangle net VDD: 1040.97,1739 1064.97,1755
  rectangle net VDD: 1163.97,1739 1188,1754.87
  rectangle net VDD: 1032,451 1064.3,471
  rectangle net VDD: 1153,451 1185,471
  rectangle net VDD: 1599,451 1610,492
  rectangle net VDDA: 1747,476 1770.5,492
  region net VDD: 1612,1718 1612,1751 1601.75,1751 1601.75,1718
  rectangle net VDDA: 1529,1718 1558,1734
  rectangle net VDDA: 1746.5,1718 1773.5,1734
  rectangle net VDD: 1708,1718 1718,1749
  rectangle net VDDA: 1423.5,1719 1450.5,1734
  rectangle net VDD: 1252,1739 1276,1755
  rectangle net VDD: 1784.13,1739 1808,1758
  rectangle net VDD: 1244,451 1276.5,471
  region net VDD: 1806,453 1806,471 1783,471 1783,453
  rectangle net VDDA: 1421,476 1447.5,492
  rectangle net VDDA: 1525.5,476 1554.5,492
  rectangle net VDD: 1485,455 1495,474
  rectangle net VDD: 1705,454 1714,474
  rectangle net VDDA: 1641,1718 1666,1734
  rectangle net VDD: 1486,1719 1497.5,1734
  rectangle net VDDA: 1316.5,476 1341.5,492
  rectangle net VDD: 1376.5,476 1391.5,492
  rectangle net GND: 1009.78,502 1982.22,1708
  region net GND: 1894,479 1906,479 1906,463
  region net GND: 1894,479 1906,479 1906,463 1878,463 1878,471 1894,471
  region net GND: 1878,471 1894,471 1894,479 1906,479 1906,463 1878,463
  pour cut-out: 4351.27,-53.75 4344.73,-55.23 4339.45,-56.82 4333.67,-59.2 4328.66,-61.68 4326.09,-63.21 4323.66,-64.72 4319.12,-67.97 4315.06,-71.34 4310.33,-76.17 4306.06,-81.44 4302.93,-85.61 4301.77,-87.42 4300.37,-89.86 4297.17,-96.37 4294.71,-102.44 4292.43,-111.43 4291.56,-117.25 4291.27,-123.82 4291.21,-127.41 4291.65,-132.99 4292.35,-137.93 4293.16,-141.5 4293.67,-143.73 4294.62,-146.79 4296.44,-151.99 4298.82,-157.22 4301.72,-162.57 4304.29,-166.62 4307.33,-170.73 4312.38,-176.31 4320.48,-183.33 4329.44,-188.99 4339.98,-193.46 4346.42,-195.3 4349.71,-196.03 4353.47,-196.58 4357.53,-197.1 4361.21,-197.26 4364.82,-197.25 4367.93,-197.1 4371.21,-196.86 4373.54,-196.51 4376.44,-196.09 4380.95,-195.07 4384.59,-194.11 4388.44,-192.82 4391.6,-191.47 4394.68,-190.15 4398.06,-188.38 4400.3,-187.11 4402.32,-185.86 4405.89,-183.44 4409.02,-181 4412.29,-178.12 4414.45,-176.11 4417.55,-172.89 4420.78,-169.07 4422.34,-166.87 4426.4,-160.35 4428.1,-157.14 4429.61,-153.82 4431.92,-147.65 4434.09,-140.33 4434.99,-133.95 4435.55,-128.24 4435.55,-121.78 4435.18,-117.04 4434.51,-112.29 4432.22,-102.78 4429.01,-94.66 4423.73,-85.11 4419.93,-80.03 4415.88,-75.13 4411.18,-70.81 4406.26,-66.75 4398.54,-61.85 4392.43,-58.84 4381.86,-55.04 4368.59,-52.69 4359.86,-52.84 4355.61,-53.2
  pour cut-out: 3105.27,-53.75 3098.73,-55.23 3093.45,-56.82 3087.67,-59.2 3082.66,-61.68 3080.09,-63.21 3077.66,-64.72 3073.12,-67.97 3069.06,-71.34 3064.33,-76.17 3060.06,-81.44 3056.93,-85.61 3055.77,-87.42 3054.37,-89.86 3051.17,-96.37 3048.71,-102.44 3046.43,-111.43 3045.56,-117.25 3045.27,-123.82 3045.21,-127.41 3045.65,-132.99 3046.35,-137.93 3047.16,-141.5 3047.67,-143.73 3048.62,-146.79 3050.44,-151.99 3052.82,-157.22 3055.72,-162.57 3058.29,-166.62 3061.33,-170.73 3066.38,-176.31 3074.48,-183.33 3083.44,-188.99 3093.98,-193.46 3100.42,-195.3 3103.71,-196.03 3107.47,-196.58 3111.53,-197.1 3115.21,-197.26 3118.82,-197.25 3121.93,-197.1 3125.21,-196.86 3127.54,-196.51 3130.44,-196.09 3134.95,-195.07 3138.59,-194.11 3142.44,-192.82 3145.6,-191.47 3148.68,-190.15 3152.06,-188.38 3154.3,-187.11 3156.32,-185.86 3159.89,-183.44 3163.02,-181 3166.29,-178.12 3168.45,-176.11 3171.55,-172.89 3174.78,-169.07 3176.34,-166.87 3180.4,-160.35 3182.1,-157.14 3183.61,-153.82 3185.92,-147.65 3188.09,-140.33 3188.99,-133.95 3189.55,-128.24 3189.55,-121.78 3189.18,-117.04 3188.51,-112.29 3186.22,-102.78 3183.01,-94.66 3177.73,-85.11 3173.93,-80.03 3169.88,-75.13 3165.18,-70.81 3160.26,-66.75 3152.54,-61.85 3146.43,-58.84 3135.86,-55.04 3122.59,-52.69 3113.86,-52.84 3109.61,-53.2
  pour cut-out: 4351.27,2406.25 4344.73,2404.77 4339.45,2403.18 4333.67,2400.8 4328.66,2398.32 4326.09,2396.79 4323.66,2395.28 4319.12,2392.03 4315.06,2388.66 4310.33,2383.83 4306.06,2378.56 4302.93,2374.39 4301.77,2372.58 4300.37,2370.14 4297.17,2363.63 4294.71,2357.56 4292.43,2348.57 4291.56,2342.75 4291.27,2336.18 4291.21,2332.59 4291.65,2327.01 4292.35,2322.07 4293.16,2318.5 4293.67,2316.27 4294.62,2313.21 4296.44,2308.01 4298.82,2302.78 4301.72,2297.43 4304.29,2293.38 4307.33,2289.27 4312.38,2283.69 4320.48,2276.67 4329.44,2271.01 4339.98,2266.54 4346.42,2264.7 4349.71,2263.97 4353.47,2263.42 4357.53,2262.9 4361.21,2262.74 4364.82,2262.75 4367.93,2262.9 4371.21,2263.14 4373.54,2263.49 4376.44,2263.91 4380.95,2264.93 4384.59,2265.89 4388.44,2267.18 4391.6,2268.53 4394.68,2269.85 4398.06,2271.62 4400.3,2272.89 4402.32,2274.14 4405.89,2276.56 4409.02,2279 4412.29,2281.88 4414.45,2283.89 4417.55,2287.11 4420.78,2290.93 4422.34,2293.13 4426.4,2299.65 4428.1,2302.86 4429.61,2306.18 4431.92,2312.35 4434.09,2319.67 4434.99,2326.05 4435.55,2331.76 4435.55,2338.22 4435.18,2342.96 4434.51,2347.71 4432.22,2357.22 4429.01,2365.34 4423.73,2374.89 4419.93,2379.97 4415.88,2384.87 4411.18,2389.19 4406.26,2393.25 4398.54,2398.15 4392.43,2401.16 4381.86,2404.96 4368.59,2407.31 4359.86,2407.16 4355.61,2406.8
  text "L1 : TOP COMPONENT SIDE : CONTROLLED IMPEDANCE" at 5,-615 h50
Signal 1:
  text "L3 : SIGNAL 1: CONTROLLED IMPEDANCE" at 157.42,-773.89 h50
VDD:
  text "L6 : VDD, VDDGWT, U2_VCC, 3P3V, 3P3V_RAW" at 157.42,-1083.89 h50
VDDA:
  text "L5 : VDDA, VDDPST, VDDPLL, 3P3V" at 157.42,-973.89 h50
Signal 2:
  text "L8 : Signal 2: CONTROLLED IMPEDANCE" at 145,-1295 h50
Bottom Layer:
  region net GND: 1576,1734 1549,1734 1549,1670 1576,1670
  region net GND: 1684.5,1734 1663.5,1734 1663.5,1670 1684.5,1670
  rectangle net GND: 1337,476 1362,538
  rectangle net GND: 1444,476 1468,540
  rectangle net GND: 1547,476 1581,540
  rectangle net GND: 1661,476 1688,540
  text "L10 : BOTTOM SIDE :  CONTROLLED IMPEDANCE" at 5270,-1255 h50
  text "L10 : BOTTOM SIDE :  CONTROLLED IMPEDANCE" at -20,-1580 h50
GND1 (plane layer: these items are gaps in the copper):
  circle w60: c100,1105 r30
  lines w60: 120,1105 890,1105
  text "L2 : GND1" at 155,-675 h50
GND4 (plane layer: these items are gaps in the copper):
  pour cut-out: 1906.7,1932.24 1906.7,1948.24 1862.7,1948.24 1862.7,1932.24
  pour cut-out: 1906.7,1967.24 1906.7,1983.24 1862.7,1983.24 1862.7,1967.24
  pour cut-out: 1682,1897 1682,1913 1638,1913 1638,1897
  pour cut-out: 1682,1932 1682,1948 1638,1948 1638,1932
  pour cut-out: 1773,2012 1773,2038 1727,2038 1727,2012
  pour cut-out: 1773,2042 1773,2068 1727,2068 1727,2042
  pour cut-out: 1753,301.5 1769,301.5 1769,350 1753,350
  pour cut-out: 1718,301.5 1734,301.5 1734,350 1718,350
  text "L9 :  GND4" at 140,-1410 h50
GND2 (plane layer: these items are gaps in the copper):
  text "L4 :  GND2" at 155,-880 h50
GND3 (plane layer: these items are gaps in the copper):
  text "L7 :  GND3" at 150,-1200 h50

## Silkscreen, mask and mechanical layers (free items; w line width, h text height)
Top Overlay:
  circle w30: c3630.58,157.54 r1
  circle w30: c3624,1821 r1
  region: 3391.15,1495.04 3391.15,1675.04 2677.48,1675.04 2677.48,1495.04
  region: 4490,1500 4490,1635 4080,1635 4080,1500
  text "K" at 4731,2126 h40
  text "J" at 4781,2126 h40
  text "H" at 4831,2126 h40
  text "G" at 4881,2126 h40
  text "F" at 4931,2126 h40
  text "D" at 5031,2126 h40
  text "C" at 5076,2126 h40
  text "B" at 5126,2126 h40
  text "A" at 5176,2126 h40
  text "UCB: Space Sciences Lab" at 850,2105 h60
  text "1" at 4686,2091 h40
  text "2" at 5229.64,2039.71 h40
  text "Timepix4 SCB Rev 1" at 845,2005 h60
  text "3" at 4686,1986 h40
  text "EM ASSY EAG00233" at 845,1910 h60
  text "4" at 4945,1886 h40
  text "5" at 4739.16,1836 h40
  text "6" at 5222,1786 h40
  text "7" at 4736.9,1741 h40
  text "8" at 5222,1686 h40
  text "S/N" at 2753.95,1675.04 h60
  text "9" at 4692,1636 h40
  text "10" at 5215.48,1583.87 h40
  text "REV" at 3897.41,1573 h60
  text "11" at 4721.76,1532.76 h40
  text "12" at 5213.16,1494.84 h40
  text "13" at 5212.5,1438 h40
  text "14" at 5215.48,1383.87 h40
  text "15" at 4659.03,1339.1 h40
  text "16" at 5210.64,1292.71 h40
  text "17" at 4723,1241 h40
  text "19" at 4721,1135 h40
  text "21" at 4714.39,1041.9 h40
  text "22" at 5218.99,989.99 h40
  text "23" at 4696,932.76 h40
  text "25" at 4654.21,839.24 h40
  text "27" at 4759.5,736 h40
  text "28" at 5215.48,683.87 h40
  text "29" at 4753,635 h40
  text "30" at 5211.64,591.71 h40
  text "31" at 4759.5,536 h40
  text "32" at 5215.48,483.87 h40
  text "33" at 4749,436 h40
  text "36" at 4753,277 h40
  text "37" at 5211.64,237.71 h40
  text "38" at 4710.92,186 h40
  text "39" at 5167.5,136 h40
  text "40" at 4705,93 h40
  text "K" at 4731,51 h40
  text "J" at 4781,51 h40
  text "H" at 4831,51 h40
  text "G" at 4881,51 h40
  text "F" at 4931,51 h40
  text "E" at 4981,51 h40
  text "D" at 5031,51 h40
  text "C" at 5076,51 h40
  text "OVERLAY TOP" at 157.42,-383.89 h50
Bottom Overlay:
  region: 3332,617 3332,797 2404,797 2404,617
  text "98" at 1445.22,2131 h40
  text "143" at 1692.85,2131 h40
  text "145" at 1836.75,2131 h40
  text "97" at 1123,2109 h40 r270
  text "147" at 2025,2088 h40
  text "144" at 1692,2086 h40
  text "146" at 1836,2081 h40
  text "148" at 2024,2036 h40
  text "54" at 1622,2014 h40 r270
  text "44" at 1366,2013 h40 r270
  text "46" at 1413,2013 h40 r270
  text "48" at 1463,2013 h40 r270
  text "50" at 1517,2013 h40 r270
  text "52" at 1570,2012 h40 r270
  text "56" at 1675,2009 h40 r270
  text "42" at 1251,2001 h40 r270
  text "39" at 1185,1994 h40 r270
  text "45" at 1392,1947 h40
  text "105" at 2096,1942 h40
  text "49" at 1508,1928 h40
  text "35" at 986,1925 h40 r270
  text "36" at 1043,1925 h40 r270
  text "38" at 1107,1922 h40 r270
  text "64" at 1914,1916 h40 r270
  text "58" at 1732,1900 h40 r270
  text "47" at 1428.53,1898.56 h40
  text "60" at 1797,1890 h40 r270
  text "106" at 2346.77,1886.78 h40
  text "40" at 1249,1881 h40
  text "86" at 1004,1876 h40
  text "53" at 1602,1876 h40
  text "51" at 1520,1862 h40
  text "65" at 2235,1861 h40
  text "37" at 1119,1856 h40
  text "61" at 1884,1848 h40
  text "57" at 1720,1847 h40
  text "161" at 2215,1846 h40 r90
  text "41" at 1235,1840 h40 r270
  text "34" at 942.82,1833.56 h40
  text "59" at 1799,1830 h40
  text "55" at 1650,1828 h40
  text "62" at 2004,1806 h40
  text "87" at 2334,1806 h40
  text "43" at 1304,1799 h40 r270
  text "157" at 622,1788 h40 r270
  text "78" at 800,1747 h40 r270
  text "63" at 1883,1737 h40
  text "79" at 2344,1726 h40
  text "66" at 2240,1707 h40
  text "UCB: Space Sciences Lab" at 3704,1504 h60
  text "Timepix4 SCB Rev 1" at 3704,1421 h60
  text "EM ASSY EAG00233" at 3704,1326 h60
  text "119" at 774,446 h40
  text "8" at 1256,445 h40 r90
  text "1" at 970,436 h40
  text "10" at 1328,431 h40
  text "7" at 1205,430 h40
  text "2" at 993,417 h40 r270
  text "30" at 1877,414 h40
  text "121" at 804,381 h40
  text "14" at 1408,345 h40
  text "27" at 1785,335 h40 r270
  text "18" at 1492,330 h40
  text "6" at 1211,329 h40 r270
  text "4" at 1074,322 h40
  text "33" at 2006,320 h40
  text "R18" at 999,316 h40
  text "120" at 2349,311 h40
  text "9" at 1261,309 h40 r270
  text "26" at 1711,308 h40
  text "12" at 1376,307 h40
  text "22" at 1626,307 h40
  text "5" at 1117,299 h40
  text "16" at 1468,286 h40
  text "32" at 2023,281 h40 r270
  text "3" at 1053,266 h40 r270
  text "20" at 1631,249 h40
  text "24" at 1703,246 h40
  text "122" at 2349,246 h40
  text "162" at 2079,241 h40 r270
  text "11" at 1323,220 h40 r270
  text "15" at 1423,217 h40 r270
  text "R17" at 1039,211 h40
  text "130" at 1134,209 h40 r270
  text "13" at 1373,208 h40 r270
  text "25" at 1766,207 h40 r270
  text "139" at 2068,207 h40
  text "23" at 1709,205 h40 r270
  text "31" at 1875,179 h40 r270
  text "19" at 1594.25,161 h40 r270
  text "21" at 1646.8,161 h40 r270
  text "R21" at 891,152 h40
  text "29" at 1932,130 h40
  text "140" at 2201.87,121 h40
  text "92" at 1429,111 h40 r270
  text "17" at 1492,97 h40 r270
  text "R22" at 893,96 h40
  text "155" at 1715,92 h40 r270
  text "156" at 1771,91 h40 r270
  text "96" at 1548.88,88.38 h40 r270
  text "154" at 1709,86 h40
  text "28" at 1868,50 h40 r270
  text "137" at 1534,38 h40
  text "153" at 1704,31 h40
  text "BOTTOM OVERLAY" at 5095,-1470 h50
  text "BOTTOM OVERLAY" at 140,-1863 h50
Top Paste:
  text "SOLDER PASTE TOP" at 165,-295 h50
Bottom Paste:
  text "SOLDER PASTE BOTTOM" at 5100,-1595 h50
  text "SOLDER PASTE BOTTOM" at 134,-1996 h50
Top Solder:
  rectangle: 2992,2210 4488,2460
  rectangle: 2992,-250 4488,0
  rectangle: 0,1960 250,2210
  rectangle: 0,0 250,255
  text "SOLDERMASK TOP" at 165,-475 h50
Bottom Solder:
  rectangle: 2992,2210 4488,2460
  rectangle: 2992,-250 4488,0
  rectangle: 671,515 2321,1695
  rectangle: 1.7,1959.5 251.7,2209.5
  rectangle: 0,0 250,250
  text "SOLDERMASK BOTTOM" at 5100,-1335 h50
  text "SOLDERMASK BOTTOM" at 144,-1685 h50